# Altium PCB PB_PCB.PcbDoc
Units mil, origin at the board's own origin, x right, y up, seen from the top; angles counter-clockwise.
Board outline 1020 x 482 mil, 2 copper layers (Top Layer, Bottom Layer), stack 50 mil thick; 25 components, 17 nets, 108 pads, 30 vias.
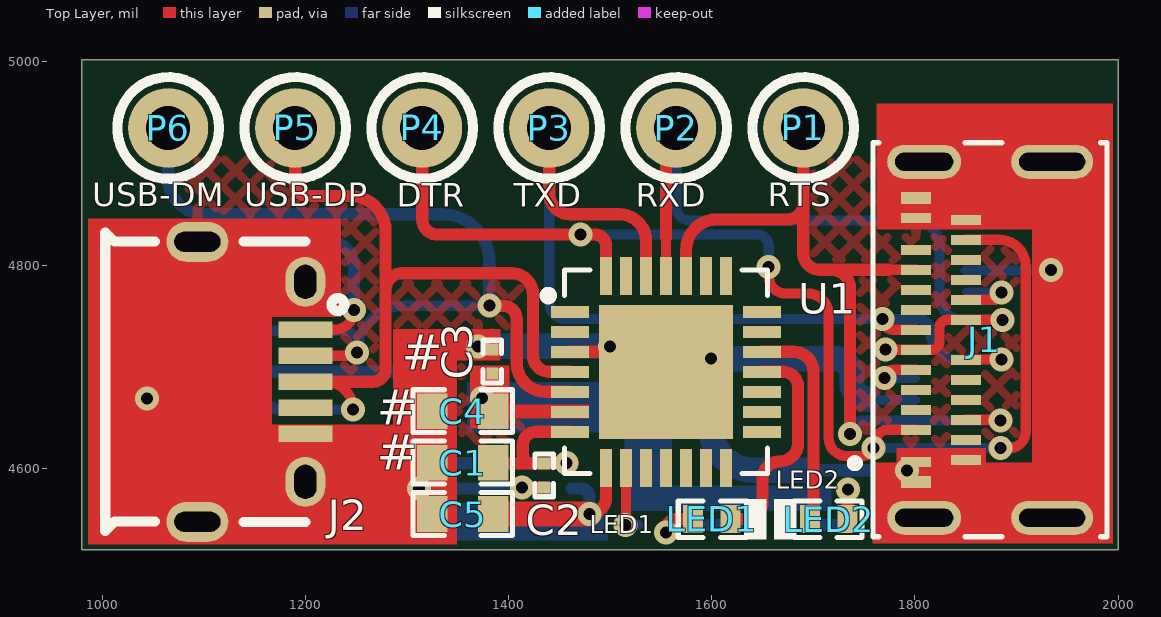
[diagram p0: Top Layer view]
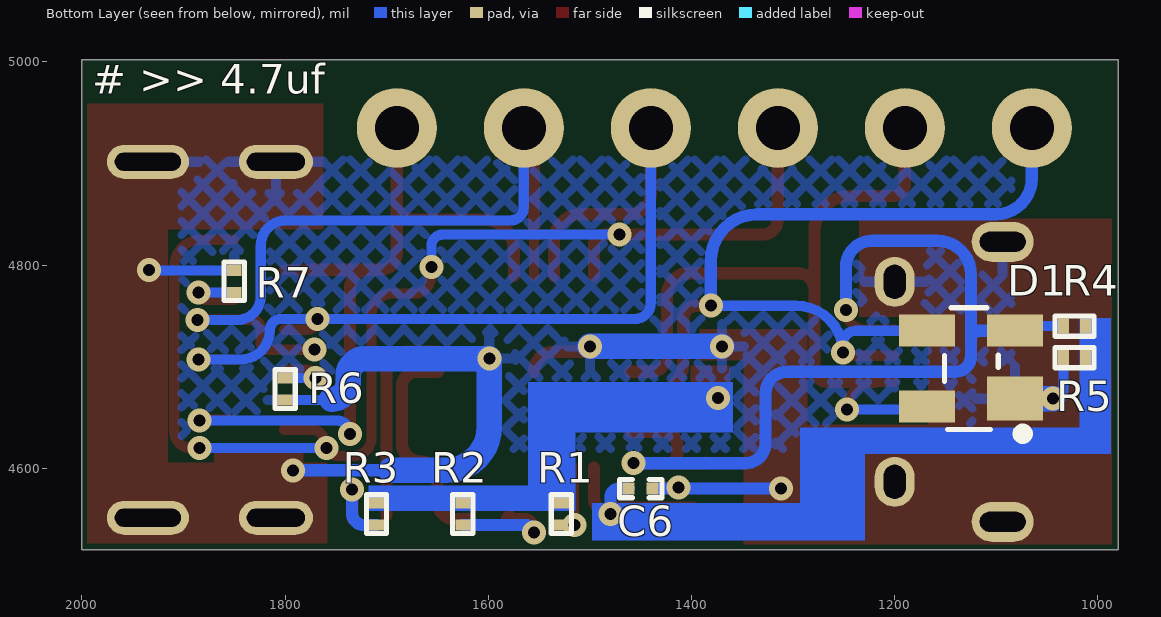
[diagram p1: Bottom Layer view, seen from below]
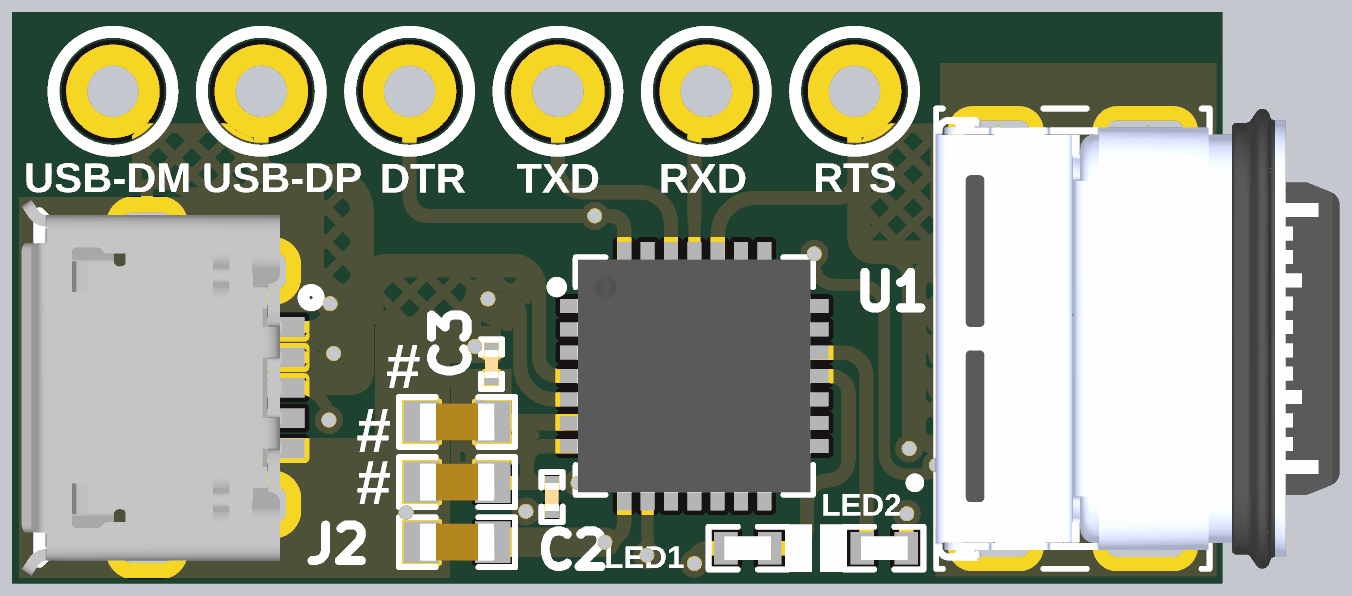
[diagram p2: 3D render of the assembled board from above, using the file's embedded part models]
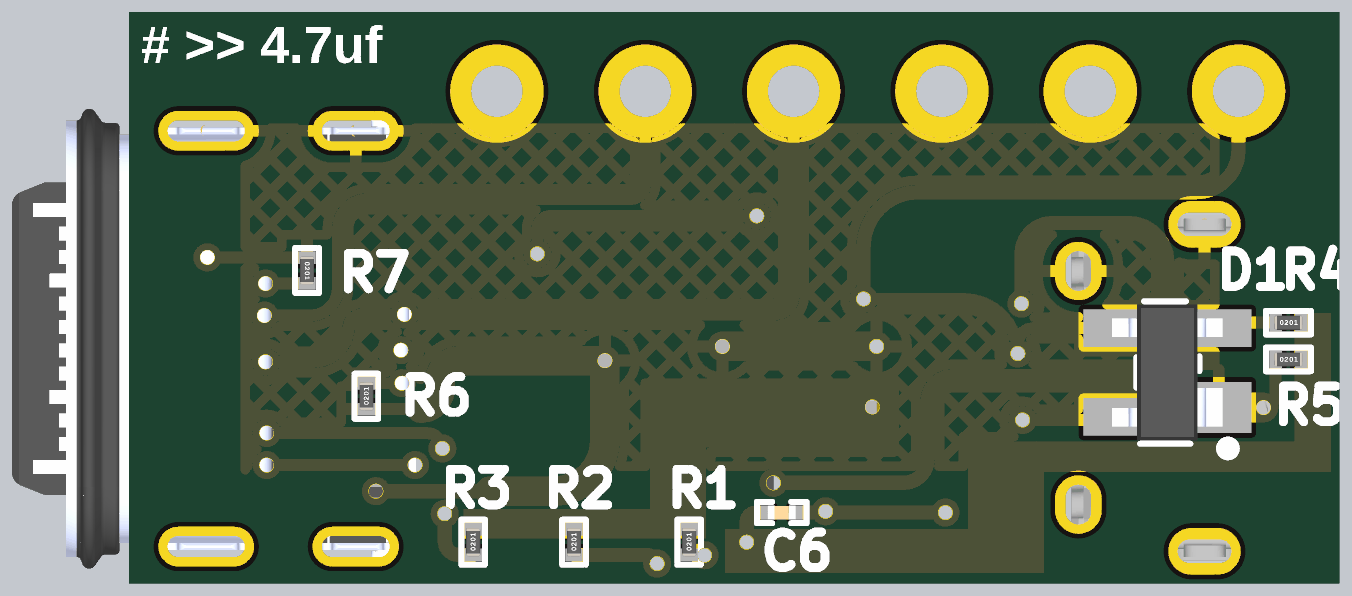
[diagram p3: 3D render of the assembled board from below, using the file's embedded part models]

## Layer stack, top to bottom
Top Solder: solder mask 3, Solder Resist, Dk 3.5
Top Layer: signal copper 10
Dielectric 1: dielectric 37, FR-4, Dk 4.8
Bottom Layer: signal copper 3
Bottom Solder: solder mask 10, Solder Resist, Dk 3.5

## Board outline
980,4520 980,5002 2000,5002 2000,4520

## Design rules (kind name [scope] priority, off if disabled: settings)
Clearance [All] p1: gap=0 ignorepadtopadclearanceinfootprint=FALSE
MinimumSolderMaskSliver [All] p1: minsoldermaskwidth=0
PolygonConnect [All] p1: connectstyle=Relief reliefconductorwidth=10 reliefentries=4 polygonreliefangle="90 Angle" airgapwidth=10
RoutingVias [All] p1: holewidth=11.81 width=23.62 viastyle="Through Hole" minholewidth=11.81 minwidth=23.62 maxholewidth=11.81 maxwidth=23.62
SilkToSilkClearance [All] p1: silktosilkclearance=0
SilkToSolderMaskClearance [IsPad] p1: minsilkscreentomaskgap=0 clearancetoexposedcopper=TRUE
SolderMaskExpansion [All] p1: expansion=4
Width [All] p1: maxlimit=25 minlimit=10 preferedwidth=10
27 further rules are at their usual default settings.

## Classes and differential pairs
component class "U_USB-UART Section": C1 C2 C3 C4 C5 C6 LED1 LED2 P1 P2 P3 P4 P5 P6 R1 R2 R3
component class "U_Connector Section": D1 J1 J2 R4 R5 R6 R7

## Components (designator, comment, footprint, x,y, rotation, side; value= is the part's Value field where it differs from the comment)
C1 "4.7uF" Cap0603 1355,4605.67 r180 top
C2 "0.1uF" "CAP 0201" 1435,4593 r270 top
C3 "0.1uF" "CAP 0201" 1384,4705 r90 top
C4 "4.7uF" Cap0603 1355,4656.33 r180 top
C5 "4.7uF" Cap0603 1355,4555 r180 top
C6 "0.1uF" "CAP 0201" 1450,4580 r180 bottom
D1 "SP0503BAHTG" SOT-143-4 1125,4698 r90 bottom
J1 "2305018-2" 2305018-2 1868.07,4726.5 r90 top
J2 "10118194-0001LF" 10118194-0001LF 1200,4685.13 r270 top
LED1 "LED Blue" "LED 0402" 1600,4550 r0 top
LED2 "LED Blue" "LED 0402" 1715,4550 r180 top
P1 "Test Point" "TEST POINT" 1690,4935 r0 top
P2 "Test Point" "TEST POINT" 1565,4935 r0 top
P3 "Test Point" "TEST POINT" 1440,4935 r0 top
P4 "Test Point" "TEST POINT" 1315,4935 r0 top
P5 "Test Point" "TEST POINT" 1190,4935 r0 top
P6 "Test Point" "TEST POINT" 1065,4935 r0 top
R1 "1K" Res-0201 1528,4555 r90 bottom
R2 "470R" Res-0201 1625,4555 r90 bottom
R3 "470R" Res-0201 1710,4555 r90 bottom
R4 "22.1K" Res-0201 1023,4740 r180 bottom
R5 "47.5K" Res-0201 1023,4709 r180 bottom
R6 "5.1K" Res-0201 1800,4678 r90 bottom
R7 "5.1K" Res-0201 1850,4784 r270 bottom
U1 "CP2102N-A02-GQFN28R" "28-QFN (5x5)" 1555,4695 r0 top

## Footprints (in the part's own frame and the unit in brackets; to place one, negate y for a bottom-side part, rotate by r counter-clockwise, add the part's x,y. Pads: shape width x height; smd on the part's side, far side on the other; paste and mask are expansions set on the pad)
"28-QFN (5x5)" [mm] "IC USB TO UART BRIDGE QFN28"
  rect 0.95x0.3 smd: 1(-2.4,1.5) 2(-2.4,1) 3(-2.4,0.5) 4(-2.4,0) 5(-2.4,-0.5) 6(-2.4,-1) 7(-2.4,-1.5) 15(2.4,-1.5) 16(2.4,-1) 17(2.4,-0.5) 18(2.4,0) 19(2.4,0.5) 20(2.4,1) 21(2.4,1.5)
  rect 0.3x0.95 smd: 8(-1.5,-2.4) 9(-1,-2.4) 10(-0.5,-2.4) 11(0,-2.4) 12(0.5,-2.4) 13(1,-2.4) 14(1.5,-2.4) 22(1.5,2.4) 23(1,2.4) 24(0.5,2.4) 25(0,2.4) 26(-0.5,2.4) 27(-1,2.4) 28(-1.5,2.4)
  rect 3.35x3.35 smd: 29(0,0)
  silkscreen extent -3.04,-2.54 2.54,2.54, body extent -2.5,-2.5 2.5,2.5, height 1
2305018-2 [mm] "CONN RCP USB3.1 TYPEC 24P SMD RA"
  rect 0.25x0.75 smd: A1(-3.05,1.7) A2(-2.25,1.7) A3(-1.75,1.7) A4(-1.25,1.7) A5(-0.75,1.7) A6(-0.25,1.7) A7(0.25,1.7) A8(0.75,1.7) A9(1.25,1.7) A10(1.75,1.7) A11(2.25,1.7) A12(3.05,1.7) B1(3,0.45) B2(2.5,0.45) B3(2,0.45) B4(1.5,0.45) B5(1,0.45) B6(0.5,0.45) B7(-0.5,0.45) B8(-1,0.45) B9(-1.5,0.45) B10(-2,0.45) B11(-2.5,0.45) B12(-3,0.45)
  rect 0.3x0.75 smd: G1(-3.55,1.7) G2(3.55,1.7)
  oval 0.85x2.05 hole 0.45 slot 1.65 at 90 deg: S1(-4.45,-1.7) S2(4.45,-1.7)
  oval 0.85x1.85 hole 0.45 slot 1.45 at 90 deg: S3(4.45,1.5) S4(-4.45,1.5)
  silkscreen extent -4.92,-3.07 4.92,3.33, body extent -4.92,-5.86 4.92,2.79, height 3.53
10118194-0001LF [mm]
  rect 0.42x1.35 smd: 1(-1.3,0) 2(-0.65,0) 3(0,0) 4(0.65,0) 5(1.3,0)
  oval 1.25x1 hole 0.55 slot 0.85 at 0 deg: MH1(-2.5,0) MH2(2.5,0)
  oval 1x1.55 hole 0.5 slot 1.15 at 90 deg: MH3(-3.5,-2.7) MH4(3.5,-2.7)
  silkscreen extent -3.73,-5 3.72,0.98, body extent -7.67,-5.38 4.02,0.2, height 2.72
Cap0603 [mil]
  rect 30x35 smd mask+2.36: 1(-30,0) 2(30,0)
  silkscreen extent -49,-21 49,21, body extent -32,-16 31,16, height 34
"CAP 0201" [mm]
  rect 0.3x0.3 smd mask+0.055: 1(-0.3,0) 2(0.3,0)
  silkscreen extent -0.53,-0.23 0.53,0.23, body extent -0.3,-0.15 0.3,0.15, height 0.28
"LED 0402" [mm] "LED BLUE CLEAR CHIP SMD"
  rect 0.5x0.7 smd: 1(-0.47,0) 2(0.47,0)
  silkscreen extent -0.84,-0.51 1.37,0.51, body extent -0.5,-0.25 0.5,0.25, height 0.5
Res-0201 [mm]
  rect 0.27x0.37 smd: 1(-0.275,0) 2(0.275,0)
  silkscreen extent -0.48,-0.25 0.48,0.25, body extent -0.3,-0.15 0.3,0.15, height 0.29
SOT-143-4 [mm] "TVS DIODE 5.5V 8.5V SOT143-4"
  rect 1.1x1.4 smd: 1(-0.75,-1.1)
  rect 0.8x1.4 smd: 2(0.95,-1.1) 3(0.95,1.1) 4(-0.95,1.1)
  silkscreen extent -1.75,-1.42 1.52,0.66, body extent -1.46,-1.18 1.46,1.19, height 1.22
"TEST POINT" [mm]
  round 2 hole 1.1: 1(0,0)
  silkscreen extent -1.27,-1.27 1.27,1.27

## Part data
C1 C4 C5: library part C1608X5R1E475M080AC, "CAP CER 4.7UF 25V X5R 0603", Case Code (Imperial)=0603, Case Code (Metric)=1608, Dielectric=X5R, Dielectric Material=Ceramic, Manufacturer=TDK, Max Operating Temperature=85°C, Min Operating Temperature=-55°C, Package Quantity=1, Supplier Part Number 1=810-C1608X5R1E475M, Tolerance=20%, Voltage Rating=25V, Capacitance=4.7uF, Case/Package=0603, ComponentLink1Description=http://www.yageo.com/NewPortal/_en/search/productDocs.jsp?YageoPartNumber=AC0603JRNPO0BN470&src-supplier=Digi-Key, ComponentLink1URL=http://www.yageo.com/NewPortal/_en/search/productDocs.jsp?YageoPartNumber=AC0603JRNPO0BN470&src-supplier=Digi-Key, ComponentLink2Description=https://www.verical.com/server-webapp/html/getDatasheet?partID=726745&src-supplier=Verical, ComponentLink2URL=https://www.verical.com/server-webapp/html/getDatasheet?partID=726745&src-supplier=Verical, Composition=Ceramic, Depth=0.8mm, Height=0.8mm, Lead Free="Lead Free", Length=1.6mm, Manufacturer Part Number=C1608X5R1E475M080AC, Mount="Surface Mount", Packaging="Tape and Reel", Pricing 1="1=0.29, 10=0.237, 100=0.142, 500=0.106, 1000=0.09, 4000=0.076, 8000=0.072, 24000=0.07, 48000=0.067 (USD)", Radiation Hardening=No, REACH SVHC="No SVHC", Stock 1=40236, Supplier 1=Mouser, Termination=SMD/SMT, Thickness=0.039inch, Voltage Rating (DC)=25V, Weight=7.1E-05oz, Width=0.031inch
C2 C3 C6: library part GRM033C81E104KE14D, "CAP CER 0.1UF 25V X6S 0201", Capacitance=100nF, Case Code (Imperial)=0201, Case Code (Metric)=0603, Dielectric=X6S, Manufacturer=Murata, Max Operating Temperature=105°C, Min Operating Temperature=-55°C, Package Quantity=15000, Supplier Part Number 1=490-10403-1-ND, Tolerance=10%, Voltage Rating=25V, Case/Package=0201, Category="Ceramic Capacitors", ComponentLink1Description=http://www.mouser.com/ds/2/281/c02e-2905.pdf?src-supplier=Mouser, ComponentLink1URL=http://www.mouser.com/ds/2/281/c02e-2905.pdf?src-supplier=Mouser, ComponentLink2Description=http://www.farnell.com/datasheets/2722733.pdf?src-supplier=Farnell, ComponentLink2URL=http://www.farnell.com/datasheets/2722733.pdf?src-supplier=Farnell, ComponentLink3Description=http://search.murata.co.jp/Ceramy/image/img/A01X/G101/ENG/GRM033C81E104KE14-01.pdf?src-supplier=Digi-Key, ComponentLink3URL=http://search.murata.co.jp/Ceramy/image/img/A01X/G101/ENG/GRM033C81E104KE14-01.pdf?src-supplier=Digi-Key, Height=0.3mm, Length=0.024inch, Manufacturer Part Number=GRM033C81E104KE14D, Mount="Surface Mount", Packaging="Tape and Reel", Pricing 1="1=0.10000, 10=0.05100, 50=0.02780, 100=0.02260, 500=0.01616, 1000=0.01270, 2500=0.01155, 5000=0.01063 (USD)", RoHS=Yes, RoHS Compliant=Yes, Stock 1=91, Supplier 1=Digi-Key, Termination=SMD/SMT, Thickness=0.013inch, Voltage Rating (DC)=25V, Weight=1.2E-05oz, Width=0.3mm
D1: "ESD Suppressor TVS 5.5V 4-Pin(3+Tab) SOT-143 T/R", Breakdown Voltage=5.5V, Capacitance=30pF, Case/Package=SOT-143, Clamping Voltage=7.8V, Clamping Voltage-Max=8V, Leakage Current=100nA, Manufacturer=Littelfuse, Max Operating Temperature=85°C, Max Power Dissipation=225mW, Min Operating Temperature=-40°C, Power Line Protection=No, Resistor Type=Zener, Supplier Part Number 1=F2715CT-ND, Voltage Rating (DC)=5V, Category=Diodes, ComponentLink1Description=https://datasheet.ciiva.com/15143/getdatasheetpartid-116020-15143550.pdf?src-supplier=Verical, ComponentLink1URL=https://datasheet.ciiva.com/15143/getdatasheetpartid-116020-15143550.pdf?src-supplier=Verical, ComponentLink2Description=https://datasheet.ciiva.com/332/sp05xxba-332550.pdf?src-supplier=Digi-Key, ComponentLink2URL=https://datasheet.ciiva.com/332/sp05xxba-332550.pdf?src-supplier=Digi-Key, ComponentLink3Description=https://datasheet.ciiva.com/8062/littefuse-spa-sp050x-8062422.pdf?src-supplier=Element14, ComponentLink3URL=https://datasheet.ciiva.com/8062/littefuse-spa-sp050x-8062422.pdf?src-supplier=Element14, ComponentLink4Description=https://datasheet.ciiva.com/22697/1911798-22697942.pdf?src-supplier=Element14, ComponentLink4URL=https://datasheet.ciiva.com/22697/1911798-22697942.pdf?src-supplier=Element14, ComponentLink5Description=https://datasheet.ciiva.com/332/sp05xxba-332551.pdf?src-supplier=Digi-Key, ComponentLink5URL=https://datasheet.ciiva.com/332/sp05xxba-332551.pdf?src-supplier=Digi-Key, ComponentLink6Description=https://datasheet.ciiva.com/16449/sp05xxba-16449463.pdf?src-supplier=Future+Electronics, ComponentLink6URL=https://datasheet.ciiva.com/16449/sp05xxba-16449463.pdf?src-supplier=Future+Electronics, ComponentLink7Description=https://datasheet.ciiva.com/332/sp05xxba-332552.pdf?src-supplier=Digi-Key, ComponentLink7URL=https://datasheet.ciiva.com/332/sp05xxba-332552.pdf?src-supplier=Digi-Key, ComponentLink8Description=https://datasheet.ciiva.com/4509/sp05x-leadfree-4509162.pdf?src-supplier=Mouser, ComponentLink8URL=https://datasheet.ciiva.com/4509/sp05x-leadfree-4509162.pdf?src-supplier=Mouser, ComponentLink9Description=https://datasheet.ciiva.com/7650/526672-7650894.pdf?src-supplier=Element14, ComponentLink9URL=https://datasheet.ciiva.com/7650/526672-7650894.pdf?src-supplier=Element14, Depth=1.4mm, Diode Type=Avalanche, Direction=Unidirectional, Element Configuration="Common Anode", ESD Protection=Yes, Height=1.05mm, Lead Free="Lead Free", Length=3.04mm, Manufacturer Part Number=SP0503BAHTG, Max Reverse Leakage Current=100nA, Mount="Surface Mount", Number of Channels=3, Number of Elements=3, Number of Pins=4, Number of Unidirectional Channels=3, Operating Supply Voltage=5.5V, Packaging="Tape and Reel", Peak Pulse Power=225mW, Polarity=Bidirectional,Unidirectional, Power Dissipation=225mW, Pricing 1="1=0.92000, 10=0.81200, 100=0.62260, 500=0.49214, 1000=0.39371 (USD)", Radiation Hardening=No, REACH SVHC="No SVHC", Reverse Standoff Voltage=5.5V, RoHS=Yes, RoHS Compliant=Yes, Series="SP05, SPA®", Stock 1=651, Supplier 1=Digi-Key, Termination=SMD/SMT, Width=1.4mm, Working Voltage=5.5V
J1: "CONN RCP USB3.1 TYPEC 24P SMD RA"
J2: "CONN RCPT USB2.0 MICRO B SMD R/A", Color=Black, Current Rating=1.8A, Flammability Rating="UL94 V-0", Insulation Resistance=1GR, Manufacturer="Amphenol FCI", Max Operating Temperature=85°C, Max Voltage Rating (AC)=100V, Min Operating Temperature=-55°C, Package Quantity=9600, Supplier Part Number 1=609-4618-1-ND, ComponentLink1Description=http://www.amphenol-icc.com/media/wysiwyg/files/drawing/10118194.pdf?src-supplier=Digi-Key, ComponentLink1URL=http://www.amphenol-icc.com/media/wysiwyg/files/drawing/10118194.pdf?src-supplier=Digi-Key, ComponentLink2Description=https://cdn.amphenol-icc.com/media/wysiwyg/files/drawing/10118194.pdf?src-supplier=Mouser, ComponentLink2URL=https://cdn.amphenol-icc.com/media/wysiwyg/files/drawing/10118194.pdf?src-supplier=Mouser, ComponentLink3Description=https://cdn.amphenol-icc.com/media/wysiwyg/files/drawing/10118194.pdf?src-supplier=Verical, ComponentLink3URL=https://cdn.amphenol-icc.com/media/wysiwyg/files/drawing/10118194.pdf?src-supplier=Verical, Connector Type=USB,Receptacle, Contact Material="Copper Alloy", Contact Plating=Gold, Depth=5mm, Features=Shielded, Gender=Receptacle, Housing Material=Polymer, Lead Free="Lead Free", Length=8.05mm, Manufacturer Part Number=10118194-0001LF, Mount="Surface Mount,Horizontal", Number of Contacts=5, Number of Ports=1, Number of Terminals=5, Orientation="Right Angle", Packaging="Tape and Reel", Pitch=0.65mm, Pricing 1="1=0.43, 10=0.405, 25=0.3648, 50=0.3242, 100=0.3107, 250=0.28368, 500=0.27016 (USD)", Radiation Hardening=No, Stock 1=35943, Supplier 1=Digi-Key, Termination=Solder
LED1 LED2: library part APHHS1005QBC/D, "LED BLUE CLEAR CHIP SMD 0402", Case Code (Imperial)=0402, Case Code (Metric)=1005, Colour=Blue, Forward Current=20mA, Forward Voltage=3.3V, Lens Colour=Colorless, Manufacturer=Kingbright, Max Operating Temperature=85°C, Min Operating Temperature=-40°C, Package Quantity=2000, Power Rating=120mW, Supplier Part Number 1=754-1504-1-ND, Case/Package=0402, ComponentLink1Description=http://www.mouser.com/ds/2/216/APHHS1005QBC-D-54846.pdf, ComponentLink1URL=http://www.mouser.com/ds/2/216/APHHS1005QBC-D-54846.pdf, ComponentLink2Description=http://www.kingbrightusa.com/images/catalog/SPEC/APHHS1005QBC-D.pdf, ComponentLink2URL=http://www.kingbrightusa.com/images/catalog/SPEC/APHHS1005QBC-D.pdf, Dominant Wavelength=465nm, Height=0.6mm, Illumination Colour=Blue, Lead Free="Lead Free", Length=1mm, Lens Style=Clear, Lens Transparency=Clear, Luminous Intensity=60mcd, Manufacturer Part Number=APHHS1005QBC/D, Mount="Surface Mount", Packaging="Tape and Reel", Pricing 1="1=0.58, 10=0.42, 25=0.3432, 100=0.2746, 250=0.23168, 500=0.19734, 1000=0.15444 (USD)", Stock 1=57149, Supplier 1=Digi-Key, Test Current=20mA, Viewing Angle=120°, Width=0.5mm
P1 P2 P3 P4 P5 P6: library part "TEST POINT", "Test Point ON"
R1: library part RC0201FR-071KP, "RES 1K OHM 1% 1/20W 0201", Manufacturer=Yageo, Supplier Part Number 1=13-RC0201FR-071KPCT-ND, Manufacturer Part Number=RC0201FR-071KP, Pricing 1="1=0.11000, 10=0.10200, 100=0.03940, 1000=0.01734, 2500=0.01497, 5000=0.01340 (USD)", RoHS=Yes, RoHS Compliant=Yes, Stock 1=4800, Supplier 1=Digi-Key
R2 R3: library part RC0201JR-07470RL, "RES SMD 470 OHM 5% 1/20W 0201", Case Code (Imperial)=0201, Case Code (Metric)=0603, Manufacturer=Yageo, Max Operating Temperature=125°C, Max Power Dissipation=50mW, Min Operating Temperature=-55°C, Package Quantity=1, Supplier Part Number 1=311-470NCT-ND, Temperature Coefficient=200ppm/°C, Tolerance=5%, Voltage Rating=25V, Case/Package=0201, ComponentLink1Description=http://www.farnell.com/datasheets/443682.pdf?src-supplier=Farnell, ComponentLink1URL=http://www.farnell.com/datasheets/443682.pdf?src-supplier=Farnell, ComponentLink2Description=http://www.yageo.com/documents/recent/PYu-RC0201_51_RoHS_L_8.pdf?src-supplier=Avnet, ComponentLink2URL=http://www.yageo.com/documents/recent/PYu-RC0201_51_RoHS_L_8.pdf?src-supplier=Avnet, ComponentLink3Description=http://www.yageo.com/documents/recent/PYu-RC_Group_51_RoHS_L_9.pdf?src-supplier=Digi-Key, ComponentLink3URL=http://www.yageo.com/documents/recent/PYu-RC_Group_51_RoHS_L_9.pdf?src-supplier=Digi-Key, ComponentLink4Description=http://www.yageo.com/documents/recent/PYu-RC_Group_51_RoHS_L_10.pdf?src-supplier=Digi-Key, ComponentLink4URL=http://www.yageo.com/documents/recent/PYu-RC_Group_51_RoHS_L_10.pdf?src-supplier=Digi-Key, ComponentLink5Description=http://www.yageo.com.tw/exep/pages/download/literatures/PYu-R_INT-thick_7.pdf?src-supplier=Digi-Key, ComponentLink5URL=http://www.yageo.com.tw/exep/pages/download/literatures/PYu-R_INT-thick_7.pdf?src-supplier=Digi-Key, ComponentLink6Description=http://www.yageo.com/documents/recent/PYu-RC0201_51_RoHS_L_8.pdf?src-supplier=Avnet+Europe, ComponentLink6URL=http://www.yageo.com/documents/recent/PYu-RC0201_51_RoHS_L_8.pdf?src-supplier=Avnet+Europe, Composition="Thick Film", Contact Plating=Tin,Matte, Depth=0.3mm, Features="Moisture Resistant", Height=0.01inch, Lead Free="Lead Free", Length=0.6mm, Manufacturer Part Number=RC0201JR-07470RL, Military Standard=Not, Number of Pins=2, Number of Terminations=2, Packaging="Tape and Reel", Power Rating=50mW, Pricing 1="1=0.1, 10=0.028, 100=0.0115, 1000=0.00517, 2500=0.00448, 5000=0.00371 (USD)", Radiation Hardening=No, REACH SVHC="No SVHC", Resistance=470R, Stock 1=101994, Supplier 1=Digi-Key, Termination=SMD/SMT, Voltage Rating (DC)=25V, Width=0.3mm
R4: library part RMCF0201FT22K1, "RES 22.1K OHM 1% 1/20W 0201", Case Code (Imperial)=0201, Case Code (Metric)=0603, Manufacturer="Stackpole Electronics", Max Operating Temperature=125°C, Max Power Dissipation=50mW, Min Operating Temperature=-55°C, Resistance=22.1kR, Resistor Type="Thick Film", Supplier Part Number 1=RMCF0201FT22K1CT-ND, Temperature Coefficient=200ppm/°C, Tolerance=1%, Case/Package=0201, Category="Chip SMD Resistors", ComponentLink1Description=https://www.seielect.com/catalog/SEI-RMCF_RMCP.pdf?src-supplier=Avnet, ComponentLink1URL=https://www.seielect.com/catalog/SEI-RMCF_RMCP.pdf?src-supplier=Avnet, ComponentLink2Description=https://www.seielect.com/Catalog/SEI-RMCF_RMCP.pdf?src-supplier=Digi-Key, ComponentLink2URL=https://www.seielect.com/Catalog/SEI-RMCF_RMCP.pdf?src-supplier=Digi-Key, Contact Plating=Tin,Matte, Height=0.009inch, Length=0.024inch, Manufacturer Part Number=RMCF0201FT22K1, Mount="Surface Mount", Number of Terminations=2, Packaging="Tape and Reel", Pricing 1="1=0.10000, 10=0.02700, 100=0.01090, 1000=0.00488, 2500=0.00423, 5000=0.00350 (USD)", Radiation Hardening=No, RoHS=Yes, Stock 1=1717, Supplier 1=Digi-Key, Width=0.012inch
R5: library part RK73H1HTTC4752F, "RES 47.5K OHM 1% 1/20W 0201", Case Code (Imperial)=0201, Case Code (Metric)=0603, Manufacturer="KOA Speer", Max Operating Temperature=125°C, Min Operating Temperature=-55°C, Package Quantity=10000, Power Rating=50mW, Resistance=47.5kR, Resistor Type="Thick Film", Supplier Part Number 1=2019-RK73H1HTTC4752FCT-ND, Temperature Coefficient=200ppm/°C, Tolerance=1%, Voltage Rating=25V, Case/Package=0201, Category=Resistors, ComponentLink1Description=http://www.koaspeer.com/catimages/Products/RK73H/RK73H.pdf?src-supplier=Mouser, ComponentLink1URL=http://www.koaspeer.com/catimages/Products/RK73H/RK73H.pdf?src-supplier=Mouser, Construction=Rectangular, Depth=0.3mm, Height=0.23mm, Lead Free="Lead Free", Length=0.6mm, Manufacturer Part Number=RK73H1HTTC4752F, Military Standard=Not, Packaging="Tape and Reel", Pricing 1="1=0.10000, 10=0.07800, 100=0.03190, 1000=0.01432, 2500=0.01243, 5000=0.01027 (USD)", RoHS=Yes, RoHS Compliant=Yes, Series=RK73H, Stock 1=16007, Supplier 1=Digi-Key, Termination=SMD/SMT, Voltage Rating (DC)=25V, Width=0.3mm
R6 R7: library part ERA-1AEB512C, "RES 5.1K OHM 0.1% 1/20W 0201", Case/Package=0201, Manufacturer=Cliff, Resistance=5100R, Supplier Part Number 1=10-ERA-1AEB512CCT-ND, Category=Resistors, Manufacturer Part Number=ERA-1AEB512C, Pricing 1="1=0.36000, 10=0.27700, 100=0.11630, 1000=0.06416, 2500=0.06015, 5000=0.05414 (USD)", RoHS=No, Stock 1=14930, Supplier 1=Digi-Key
U1: "IC USB TO UART BRIDGE QFN28", Manufacturer="Silicon Labs", Supplier Part Number 1=336-5890-1-ND, Manufacturer Part Number=CP2102N-A02-GQFN28R, Pricing 1="1=1.47000 (USD)", RoHS=Yes, Stock 1=1242, Supplier 1=Digi-Key

## Via types
v1: diameter 23.62, hole 11.81, Top Layer to Bottom Layer, tented both sides, 30 vias

## Nets (pads, with @x,y where several pads share a name; then routed paths per layer and width w, separated by ;. In a path a pad name is that pad's centre, name@x,y a point inside that pad or via, vN(x,y) a via of type N, cw(c..) or ccw(c..) an arc to the next point about the centre after c; other vN are vias at no path point)
3V3: C3.1 C4.1 R1.2 R2.2 R3.2 U1.6 | length 19.7
  Top Layer w12: v1(1373.67,4669) 1373,4668.33 1373.33,4668 cw(c1373.33,4656.33) C4.1
DTR: J1.A2 J1.B2 P4.1 U1.28 | length 1246.3
  Top Layer w10: v1(1656,4798) 1656,4789 ccw(c1673,4789) 1673,4772 1694.51,4772 cw(c1694.51,4751.51) 1715,4751.51 1715,4630 ccw(c1733,4630) 1733,4612 1747,4612 ccw(c1747,4627) 1762,4627 cw(c1772.92,4627) 1772.92,4637.92 J1.A2 ; J1.B2 1883,4824.93 ; v1@1883,4620 v1(1884,4620) 1893,4620 ccw(c1893,4636) 1909,4636 1909,4798.93 ccw(c1883,4798.93) 1883,4824.93 ; 1883,4825 1883,4824.93
  Top Layer w12: P4.1 1315,4845 ccw(c1330,4845) 1330,4830 v1(1471,4830) 1485,4830 cw(c1485,4819.06) 1495.94,4819.06 U1.28
  Bottom Layer w10: v1(1471,4830) 1645,4830 cw(c1645,4819) 1656,4819 v1(1656,4798) ; v1(1759,4620) v1(1884,4620)
GND: C1.2 C2.2 C3.2 C4.2 C5.2 C6.2 D1.1 J1.A1 J1.A12 J1.B1 J1.B12 J1.G1 J1.G2 J1.S1 J1.S2 J1.S3 J1.S4 J2.5 J2.MH1 J2.MH2 J2.MH3 J2.MH4 R5.1 R6.1 R7.1 U1.3 U1.29 | length 1068.4
  Top Layer w12: v1(1370,4720) v1@1370,4723 ; v1(1413,4581) 1413,4581.19 C2.2 ; U1.3 1535.32,4714.69 cw(c1535.32,4695) U1.29
  Bottom Layer w10: R5.1 1033.83,4678.65 ccw(c1044,4678.65) v1(1044,4668.47) ; 1754,4668 ccw(c1754.83,4668) 1754.83,4667.17 R6.1 ; v1@1790,4596 ccw(c1790,4598) v1(1792,4598) ; R7.1 1934,4794.83 v1(1934,4795)
  Bottom Layer w12: v1(1312,4580) C6.2 ; 1696,4598 v1@1790,4598
  Bottom Layer w25: v1(1044,4668.47) D1.1 ; v1(1370,4720) v1(1500,4720) ; 1696,4598 1641.66,4598 cw(c1641.66,4640.66) 1599,4640.66 v1(1599,4708) 1721,4708 cw(c1721,4691) 1738,4691 1738,4684 ccw(c1754,4684) 1754,4668
NetJ1_A5: J1.A5 R6.2 | length 65.7
  Top Layer w10: v1(1770,4689) cw(c1777.97,4689) 1777.97,4696.97 J1.A5
  Bottom Layer w10: v1(1770,4689) R6.2@1800,4689
NetJ1_B5: J1.B5 R7.2 | length 72.4
  Top Layer w10: J1.B5 1877.87,4765.87 ccw(c1877.87,4773) v1(1885,4773)
  Bottom Layer w10: R7.2@1851.35,4773 v1(1885,4773)
NetLED1_1: LED1.1 R2.1 | length 117.7
  Top Layer w12: v1@1555,4535 1555,4540 cw(c1565,4540) 1565,4550 LED1.1 ccw(c1578.5,4550) LED1.1@1578.5,4553
  Bottom Layer w12: v1@1555,4535 1555,4536.35 cw(c1562.83,4536.35) 1562.83,4544.17 R2.1
  other v1: 1555,4537
NetLED2_1: LED2.1 R3.1 | length 83.3
  Top Layer w12: LED2.1 1733.5,4579 v1(1734,4579)
  Bottom Layer w12: R3.1 1722.38,4544.17 ccw(c1722.38,4555.79) 1734,4555.79 v1(1734,4579)
NetR1_1: R1.1 U1.9 | length 69.7
  Top Layer w10: v1@1515.63,4544 U1.9
  Bottom Layer w10: v1(1515,4544) 1515,4544.17 R1.1
RTS: J1.A10 J1.B10 P1.1 U1.24 | length 771.3
  Top Layer w10: 1774,4795.4 J1.A10 ; J1.B10 1883.24,4647.76 cw(c1883.24,4647) v1(1884,4647)
  Top Layer w12: U1.24 1574.69,4814.69 cw(c1605,4814.69) 1605,4845 1665,4845 1675,4845 ccw(c1675,4860) 1690,4860 ; P1.1 1690,4900 1690,4811.78 ccw(c1706.39,4811.78) 1706.39,4795.4 1718,4795.4 ; v1(1736,4634) 1736,4777.4 ccw(c1718,4777.4) 1718,4795.4 ; 1774,4795.4 1718,4795.4
  Bottom Layer w10: v1(1736,4634) cw(c1749,4634) 1749,4647 v1(1884,4647)
RXD: J1.A6 J1.B6 P2.1 U1.25 | length 743.3
  Top Layer w10: U1.25 1555,4827 ; v1(1771,4716.81) 1771,4716.66 J1.A6 1816.82,4716.66 ccw(c1816.82,4723.84) 1824,4723.84 1824,4738 cw(c1832.18,4738) 1832.18,4746.19 J1.B6 1886,4746.19 v1(1886,4746)
  Top Layer w12: 1555,4827 1555,4925 cw(c1565,4925) P2.1
  Bottom Layer w10: P2.1@1565,4905 1565,4857 ccw(c1578,4857) 1578,4844 1799,4844 cw(c1799,4819) 1824,4819 1824,4769 ccw(c1847,4769) 1847,4746 v1(1886,4746)
RXT: LED1.2 U1.18 | length 218.2
  Top Layer w12: LED1.2 1632.93,4550 ccw(c1632.93,4567.07) 1650,4567.07 1650,4590 cw(c1666.81,4590) 1666.81,4606.81 ccw(c1666.81,4625) 1685,4625 1685,4680 ccw(c1670,4680) 1670,4695 U1.18
TXD: J1.A7 J1.B7 P3.1 U1.26 | length 914
  Top Layer w10: v1(1768,4747) ccw(c1778.66,4747) 1778.66,4736.34 J1.A7 ; J1.B7 1850.35,4707 v1(1885,4707)
  Top Layer w12: P3.1 1440,4900.51 1440,4870.51 ccw(c1460.51,4870.51) 1460.51,4850 1509.17,4850 cw(c1509.17,4823.86) 1535.31,4823.86 U1.26
  Bottom Layer w10: P3.1@1440,4905 1440,4762.66 ccw(c1455.66,4762.66) 1455.66,4747 v1(1768,4747) 1804,4747 cw(c1804,4736) 1815,4736 ccw(c1844,4736) 1844,4707 v1(1885,4707)
TXT: LED2.2 U1.19 | length 203.2
  Top Layer w12: U1.19 1680.46,4714.69 cw(c1680.46,4695) 1700.14,4695 LED2.2@1700.14,4553.64
USB_DM: D1.3 J2.2 P6.1 U1.5 | length 910
  Top Layer w10: J2.2 1247.72,4710.72 ccw(c1247.72,4714) v1(1251,4714)
  Top Layer w12: v1(1381,4760) 1394.52,4760 cw(c1394.52,4746.52) 1408,4746.52 1408,4704 ccw(c1436.68,4704) 1436.68,4675.31 U1.5
  Bottom Layer w10: D1.3 1238.17,4735.4 cw(c1238.17,4722.57) 1251,4722.57 v1(1251,4714) cw(c1297,4714) 1297,4760 v1(1381,4760)
  Bottom Layer w12: P6.1 1065,4885.23 ccw(c1100.22,4885.23) 1100.22,4850 1335,4850 cw(c1335,4804) 1381,4804 v1(1381,4760)
USB_DP: D1.4 J2.3 P5.1 U1.4 | length 786.9
  Top Layer w10: J2.3 1219.87,4685.13 cw(c1219.87,4658) v1(1247,4658)
  Top Layer w12: P5.1 1190,4879.9 ccw(c1201.9,4879.9) 1201.9,4868 1244,4868 cw(c1244,4833) 1279,4833 1279,4775.71 ; J2.3@1219.87,4685.13 1266.13,4685.13 ccw(c1266.13,4698) 1279,4698 1279,4775.71 ; U1.4 1440,4695 cw(c1440,4711) 1424,4711 1424,4771 ccw(c1403,4771) 1403,4792 1295.29,4792 ccw(c1295.29,4775.71) 1279,4775.71
  Bottom Layer w10: D1.4 ccw(c1170.91,4660.6) 1170.91,4658 v1(1247,4658)
VBUS: C5.1 C6.1 R4.2 R5.2 U1.8 | length 173.8
  Top Layer w12: v1(1479.54,4555) ccw(c1479.54,4571.4) 1495.94,4571.4 U1.8
  Top Layer w25: 1400,4555 v1(1479.54,4555)
  Bottom Layer w12: C6.1 1471.67,4580 cw(c1471.67,4572.12) 1479.54,4572.12 v1(1479.54,4555)
VREGIN: C1.1 C2.1 D1.2 J2.1 R4.1 U1.7 | length 1000.4
  Top Layer w10: J2.1 1228.31,4736.31 ccw(c1228.31,4756) v1(1248,4756)
  Top Layer w12: C1.1 ccw(c1385.86,4605.67) 1385.86,4604.81 1423,4604.81 ; v1(1457,4605) 1457,4604.81 C2.1 1423,4604.81 ; U1.7 1426.94,4635.94 ccw(c1426.94,4623) 1414,4623 1414,4613.81 ccw(c1423,4613.81) 1423,4604.81
  Bottom Layer w10: R4.1 1077.09,4740 cw(c1077.09,4735.4) D1.2
  Bottom Layer w12: D1.2 1116.6,4735.4 cw(c1116.6,4727) 1125,4727 ; v1(1248,4756) 1248,4798 ccw(c1222,4798) 1222,4824 1158,4824 ccw(c1158,4791) 1125,4791 1125,4727 ; v1(1457,4605) 1347,4605 cw(c1347,4625) 1327,4625 1327,4674 ccw(c1306,4674) 1306,4695 1140,4695 cw(c1140,4710) 1125,4710 1125,4727
pads on no net: J1.A3 J1.A4 J1.A8 J1.A9 J1.A11 J1.B3 J1.B4 J1.B8 J1.B9 J1.B11 J2.4 U1.1 U1.2 U1.10 U1.11 U1.12 U1.13 U1.14 U1.15 U1.16 U1.17 U1.20 U1.21 U1.22 U1.23 U1.27

## Polygon pours and split planes (outlines as drawn)
GND on Top Layer "Polydon_1" (hatched 45Degree grid 20 track 8, remove dead copper, pour order 4): 1083,4902 cw(c1083,4900) 1085,4900 1085,4620 ccw(c1086,4620) 1086,4619 1899,4619 cw(c1899,4616) 1902,4616 1902,4899 cw(c1907,4899) 1907,4904 1085,4904 ccw(c1085,4902)
no net on Top Layer "Top Layer-No Net" (solid, pour order 2): 1741,4904
no net on Top Layer "Top Layer-No Net 1" (solid, pour order 0): 1120,4902
no net on Mechanical 2 (solid): 1083,4902
GND on Bottom Layer "Polydon_2" (hatched 45Degree grid 20 track 8, remove dead copper, pour order 8): 1083,4902 cw(c1083,4900) 1085,4900 1085,4620 ccw(c1086,4620) 1086,4619 1899,4619 cw(c1899,4616) 1902,4616 1902,4899 cw(c1907,4899) 1907,4904 1085,4904 ccw(c1085,4902)

## Other copper
Top Layer:
  rectangle net GND: 986,4525 1167,4761
  rectangle net GND: 987,4525 1349,4643
  rectangle net GND: 1286,4537 1349,4737
  rectangle net GND: 986,4749 1235,4846
  rectangle net GND: 1915,4526 1995,4959
  rectangle net GND: 1762,4835 1995,4959
  rectangle net GND: 1782,4593 1870,4620
  rectangle net GND: 1758,4526 1980,4605.67
  rectangle net 3V3: 1362,4639 1401,4701
  rectangle net 3V3: 1371,4649 1479,4663
  rectangle net GND: 1342,4706 1392,4737
Bottom Layer:
  rectangle net VBUS: 1248,4529 1498,4566
  rectangle net VBUS: 1229,4529 1293,4640
  rectangle net VBUS: 999.83,4614 1261,4640
  rectangle net VBUS: 987,4614 1018,4748
  rectangle net 3V3: 1514,4570 1561,4685
  rectangle net 3V3: 1359,4635 1535,4685
  rectangle net 3V3: 1514,4558 1718,4583

## Silkscreen, mask and mechanical layers (free items; w line width, h text height)
Top Overlay:
  text "USB-DM" at 990,4850 h40
  text "USB-DP" at 1140,4850 h40
  text "DTR" at 1290,4849.53 h40
  text "TXD" at 1405,4849.53 h40
  text "RXD" at 1525,4849.53 h40
  text "RTS" at 1655,4850 h40
  text "#" at 1295,4685 h60
  text "#" at 1270,4631 h60
  text "#" at 1270,4587 h60
  text "LED2" at 1663,4574 h30
  text "LED1" at 1480,4530 h30
Bottom Overlay:
  text "# >> 4.7uf" at 1990,4959 h50
Mechanical 2:
  the board outline again, w10